# Altium PCB PCB1.pcbdoc
Units mil, origin at the board's own origin, x right, y up, seen from the top; angles counter-clockwise.
Board outline 1654.3 x 1181.16 mil, 2 copper layers (Top Layer, Bottom Layer), stack 1.928 mil thick; 9 components, 8 nets, 31 pads, 1 vias.
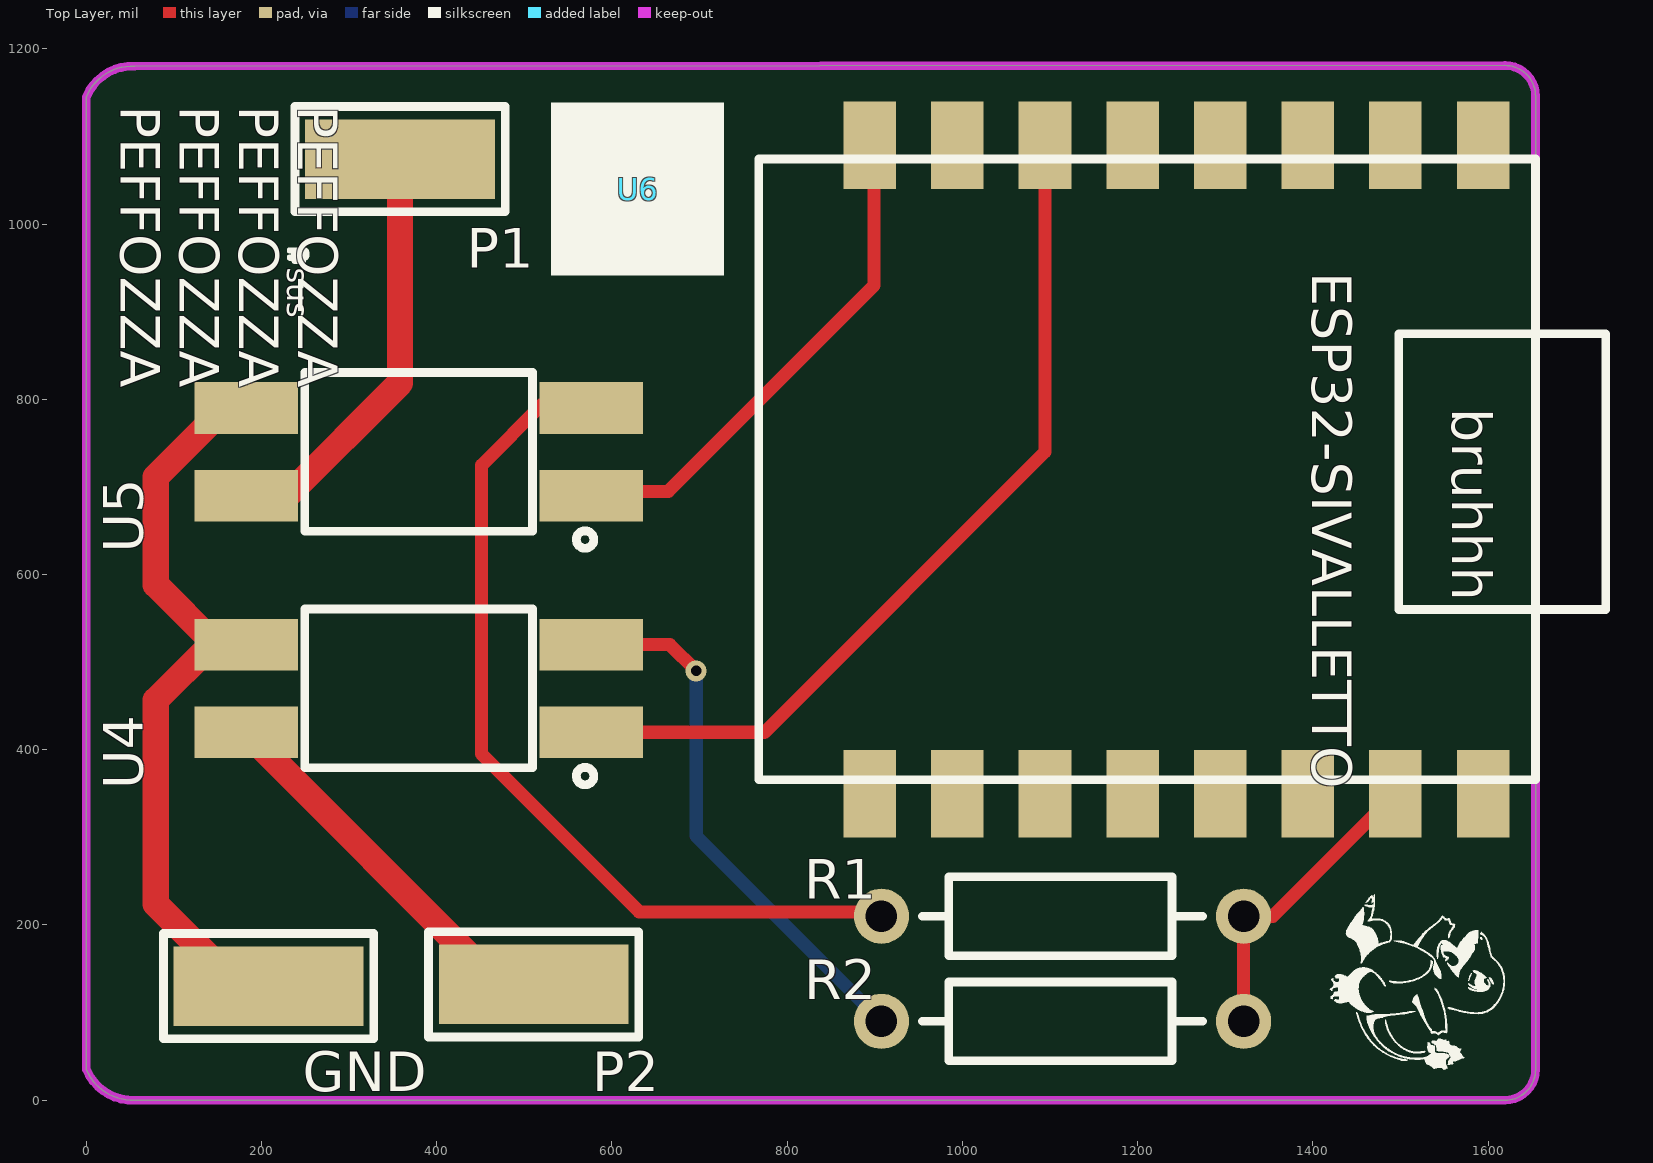
[diagram p0: Top Layer view]
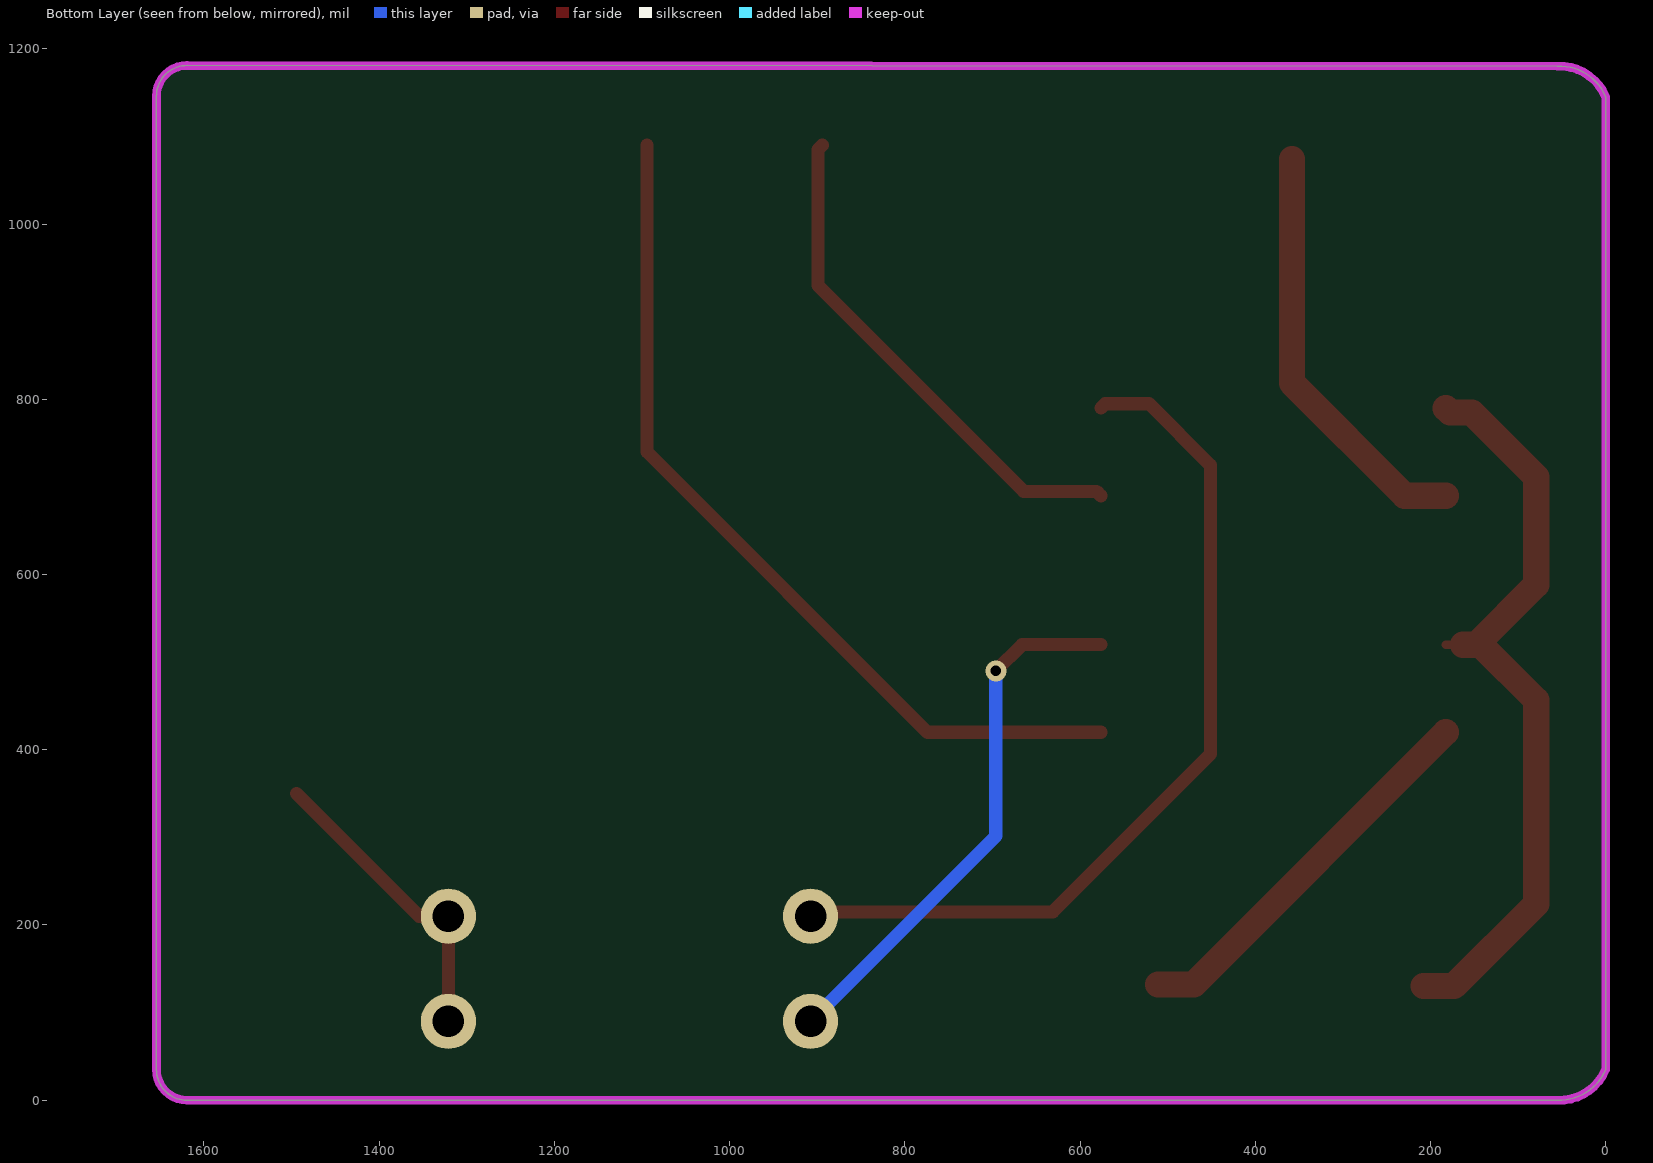
[diagram p1: Bottom Layer view, seen from below]

## Layer stack, top to bottom
Top Solder Mask Layer: solder mask 1.063, Dk 3.3
Top Layer: signal copper 0.472
Dielectric1: surface 0.984, FR4, Dk 4.5
Bottom Layer: signal copper 0.472
Bottom Solder Mask Layer: solder mask 1.063, Dk 3.3

## Board outline
0,35.08 0.06,1145.3 cw(c52.63,1123.39) 55.04,1180.29 1619.27,1181.16 cw(c1619.29,1146.16) 1654.29,1146.16 1654.29,35 cw(c1619.29,35) 1619.29,0 55,0.08 cw(c52.57,56.98) 0,35.08

## Design rules (kind name [scope] priority, off if disabled: settings)
BoardOutlineClearance copperThickness2oz_1 [All] p2 off: genericclearance=7.99 ignorepadtopadclearanceinfootprint=FALSE except(0: Arc-SplitContinuation Track-SplitContinuation SMDPad-SplitContinuation THPad-SplitContinuation Via-SplitContinuation Fill-SplitContinuation Region-SplitContinuation Poly-SplitContinuation Text-SplitContinuation Hole-SplitContinuation; 5.98: Arc-CutoutEdge Track-CutoutEdge SMDPad-CutoutEdge THPad-CutoutEdge Via-CutoutEdge Text-CutoutEdge; 6.9: Hole-OutlineEdge Hole-CutoutEdge; 10: Poly-OutlineEdge Poly-CutoutEdge; 11.81: Arc-OutlineEdge Track-OutlineEdge SMDPad-OutlineEdge THPad-OutlineEdge Via-OutlineEdge Fill-OutlineEdge Region-OutlineEdge Text-OutlineEdge Fill-CutoutEdge Region-CutoutEdge)
BoardOutlineClearance Plane_innerPlane_1 [All] p4 off: genericclearance=4.02 ignorepadtopadclearanceinfootprint=FALSE except(0: Arc-SplitContinuation Track-SplitContinuation SMDPad-SplitContinuation THPad-SplitContinuation Via-SplitContinuation Fill-SplitContinuation Region-SplitContinuation Poly-SplitContinuation Text-SplitContinuation Hole-SplitContinuation; 5.98: Arc-CutoutEdge Track-CutoutEdge SMDPad-CutoutEdge THPad-CutoutEdge Via-CutoutEdge Text-CutoutEdge; 6.9: Hole-OutlineEdge Hole-CutoutEdge; 10: Poly-OutlineEdge Poly-CutoutEdge; 11.81: Arc-OutlineEdge Track-OutlineEdge SMDPad-OutlineEdge THPad-OutlineEdge Via-OutlineEdge Fill-OutlineEdge Region-OutlineEdge Text-OutlineEdge Fill-CutoutEdge Region-CutoutEdge)
BoardOutlineClearance Copper_copperRegion_1 [All] p6 off: genericclearance=4.02 ignorepadtopadclearanceinfootprint=FALSE except(0: Arc-SplitContinuation Track-SplitContinuation SMDPad-SplitContinuation THPad-SplitContinuation Via-SplitContinuation Fill-SplitContinuation Region-SplitContinuation Poly-SplitContinuation Text-SplitContinuation Hole-SplitContinuation; 5.98: Arc-CutoutEdge Track-CutoutEdge SMDPad-CutoutEdge THPad-CutoutEdge Via-CutoutEdge Text-CutoutEdge; 6.9: Hole-OutlineEdge Hole-CutoutEdge; 10: Poly-OutlineEdge Poly-CutoutEdge; 11.81: Arc-OutlineEdge Track-OutlineEdge SMDPad-OutlineEdge THPad-OutlineEdge Via-OutlineEdge Fill-OutlineEdge Region-OutlineEdge Text-OutlineEdge Fill-CutoutEdge Region-CutoutEdge)
BoardOutlineClearance copperThickness1oz_1 [All] p8: genericclearance=4.02 ignorepadtopadclearanceinfootprint=FALSE except(0: Arc-SplitContinuation Track-SplitContinuation SMDPad-SplitContinuation THPad-SplitContinuation Via-SplitContinuation Fill-SplitContinuation Region-SplitContinuation Poly-SplitContinuation Text-SplitContinuation Hole-SplitContinuation; 5.98: Arc-CutoutEdge Track-CutoutEdge SMDPad-CutoutEdge THPad-CutoutEdge Via-CutoutEdge Text-CutoutEdge; 6.9: Hole-OutlineEdge Hole-CutoutEdge; 10: Poly-OutlineEdge Poly-CutoutEdge; 11.81: Arc-OutlineEdge Track-OutlineEdge SMDPad-OutlineEdge THPad-OutlineEdge Via-OutlineEdge Fill-OutlineEdge Region-OutlineEdge Text-OutlineEdge Fill-CutoutEdge Region-CutoutEdge)
Clearance copperThickness2oz [All] p1 off: gap=7.99 ignorepadtopadclearanceinfootprint=FALSE except(5.98: SMDPad-Track SMDPad-SMDPad THPad-Track SMDPad-THPad THPad-THPad Track-Via SMDPad-Via THPad-Via Via-Via Fill-SMDPad Region-SMDPad Fill-THPad Region-THPad Fill-Via Region-Via Fill-Fill Fill-Region Region-Region Arc-Track Arc-SMDPad Arc-THPad Arc-Via Fill-Arc Region-Arc Arc-Arc Text-Track SMDPad-Text Text-THPad Text-Via Fill-Text Region-Text Arc-Text Text-Text; 6.9: Hole-Track Hole-SMDPad Hole-THPad Hole-Via Fill-Hole Region-Hole Hole-Arc Hole-Text; 10: Poly-Track Poly-SMDPad Poly-THPad Poly-Via Poly-Fill Poly-Region Poly-Poly Poly-Arc Poly-Text Poly-Hole; 11.81: Fill-Track Region-Track)
Clearance Plane_innerPlane [All] p3 off: gap=4.02 ignorepadtopadclearanceinfootprint=FALSE except(5.98: SMDPad-Track SMDPad-SMDPad THPad-Track SMDPad-THPad THPad-THPad Track-Via SMDPad-Via THPad-Via Via-Via Fill-SMDPad Region-SMDPad Fill-THPad Region-THPad Fill-Via Region-Via Fill-Fill Fill-Region Region-Region Arc-Track Arc-SMDPad Arc-THPad Arc-Via Fill-Arc Region-Arc Arc-Arc Text-Track SMDPad-Text Text-THPad Text-Via Fill-Text Region-Text Arc-Text Text-Text; 6.9: Hole-Track Hole-SMDPad Hole-THPad Hole-Via Fill-Hole Region-Hole Hole-Arc Hole-Text; 10: Poly-Track Poly-SMDPad Poly-THPad Poly-Via Poly-Fill Poly-Region Poly-Poly Poly-Arc Poly-Text Poly-Hole; 11.81: Fill-Track Region-Track)
Clearance Copper_copperRegion [All] p5 off: gap=4.02 ignorepadtopadclearanceinfootprint=FALSE except(5.98: SMDPad-Track SMDPad-SMDPad THPad-Track SMDPad-THPad THPad-THPad Track-Via SMDPad-Via THPad-Via Via-Via Fill-SMDPad Region-SMDPad Fill-THPad Region-THPad Fill-Via Region-Via Fill-Fill Fill-Region Region-Region Arc-Track Arc-SMDPad Arc-THPad Arc-Via Fill-Arc Region-Arc Arc-Arc Text-Track SMDPad-Text Text-THPad Text-Via Fill-Text Region-Text Arc-Text Text-Text; 6.9: Hole-Track Hole-SMDPad Hole-THPad Hole-Via Fill-Hole Region-Hole Hole-Arc Hole-Text; 10: Poly-Track Poly-SMDPad Poly-THPad Poly-Via Poly-Fill Poly-Region Poly-Poly Poly-Arc Poly-Text Poly-Hole; 11.81: Fill-Track Region-Track)
Clearance copperThickness1oz [All] p7: gap=4.02 ignorepadtopadclearanceinfootprint=FALSE except(5.98: SMDPad-Track SMDPad-SMDPad THPad-Track SMDPad-THPad THPad-THPad Track-Via SMDPad-Via THPad-Via Via-Via Fill-SMDPad Region-SMDPad Fill-THPad Region-THPad Fill-Via Region-Via Fill-Fill Fill-Region Region-Region Arc-Track Arc-SMDPad Arc-THPad Arc-Via Fill-Arc Region-Arc Arc-Arc Text-Track SMDPad-Text Text-THPad Text-Via Fill-Text Region-Text Arc-Text Text-Text; 6.9: Hole-Track Hole-SMDPad Hole-THPad Hole-Via Fill-Hole Region-Hole Hole-Arc Hole-Text; 10: Poly-Track Poly-SMDPad Poly-THPad Poly-Via Poly-Fill Poly-Region Poly-Poly Poly-Arc Poly-Text Poly-Hole; 11.81: Fill-Track Region-Track)
DiffPairsRouting differentialPair [All] p1: maxlimit=6 minlimit=6 mostfreqgap=6 toplayer_minwidth=5 toplayer_prefwidth=10 toplayer_maxwidth=100 toplayer_mingap=6 toplayer_prefgap=6 toplayer_maxgap=6 bottomlayer_minwidth=5 bottomlayer_prefwidth=10 bottomlayer_maxwidth=100 bottomlayer_mingap=6 bottomlayer_prefgap=6 bottomlayer_maxgap=6 maxuncoupledlength=10
HoleToHoleClearance otherClearance [All] p1: gap=11.81 allowstackedmicrovias=TRUE
Length netLength [All] p1: minlimit=0 maxlimit=0
PasteMaskExpansion pasteMaskExpansion [All] p1: expansion=0
PlaneConnect innerPlane [All] p1: planeconnectstyle=Relief reliefexpansion=20 reliefentries=4 reliefconductorwidth=10 reliefairgap=10
PolygonConnect copperRegion [All] p1: connectstyle=Relief reliefconductorwidth=10 reliefentries=4 polygonreliefangle="90 Angle" airgapwidth=10 via.connectstyle=Relief via.reliefconductorwidth=10 via.reliefentries=4 via.polygonreliefangle="90 Angle" via.airgapwidth=10
RoutingVias viaSize [All] p1: holewidth=12.01 width=24.02 viastyle="Through Hole" minholewidth=11.81 minwidth=19.68 maxholewidth=248.03 maxwidth=393.7
SolderMaskExpansion solderMaskExpansion [IsVia] p1: expansion=-1000 istentingtop=TRUE
SolderMaskExpansion solderMaskExpansion [All] p2: expansion=2 istentingtop=FALSE
Width copperThickness2oz_2 [All] p1 off: maxlimit=100 minlimit=8 preferedwidth=10
Width copperThickness1oz_2 [All] p2: maxlimit=100 minlimit=5 preferedwidth=10

## Components (designator, comment, footprint, x,y, rotation, side; value= is the part's Value field where it differs from the comment)
ESP32-SIVALLETTO "ESP32-C3-SUPER-MINI" ESP32-C3-SUPER-MINI 1274.29,720 r270 top
GND "PAD" PAD-SMD_L5.0-W2.0_STHW4-DU-HN050206 208.07,130.24 r180 top
P1 "PAD" PAD-SMD_L5.0-W2.0_STHW4-DU-HN050206 358.07,1074.16 r0 top
P2 "PAD" PAD-SMD_L5.0-W2.0_STHW4-DU-HN050206 510.6,132.19 r180 top
R1 "220Ω" RES-TH_BD2.2-L6.5-P10.50-D0.6 1114.29,210 r180 top
R2 "220Ω" RES-TH_BD2.2-L6.5-P10.50-D0.6 1114.29,90 r180 top
U4 "LTV-817S-TA1" OPTO-SMD-4_L4.6-W6.5-P2.54-LS10.3-BL 379.29,470 r90 top
U5 "LTV-817S-TA1" OPTO-SMD-4_L4.6-W6.5-P2.54-LS10.3-BL 379.29,740 r90 top
U6 "" JLC-QRCODE-5x5 629.29,1040 r0 top

## Footprints (in the part's own frame and the unit in brackets; to place one, negate y for a bottom-side part, rotate by r counter-clockwise, add the part's x,y. Pads: shape width x height; smd on the part's side, far side on the other; paste and mask are expansions set on the pad)
ESP32-C3-SUPER-MINI [mil]
  rect 100x60 smd paste+0 mask+2: 1(-370,320) 2(-370,220) 3(-370,120) 4(-370,20) 5(-370,-80) 6(-370,-180) 7(-370,-280) 8(-370,-380) 9(370,-380) 10(370,-280) 11(370,-180) 12(370,-80) 13(370,20) 14(370,120) 15(370,220) 16(370,320)
  silkscreen extent -354,-507 354,460
JLC-QRCODE-5x5 [mil]
  silkscreen extent -98,-98 98,98
OPTO-SMD-4_L4.6-W6.5-P2.54-LS10.3-BL [mm]
  rect 1.5x3 smd: 1(-1.27,-5) 2(1.27,-5) 3(1.27,5) 4(-1.27,5)
  silkscreen extent -2.79,-5.08 2.3,3.3
PAD-SMD_L5.0-W2.0_STHW4-DU-HN050206 [mm]
  rect 5.5x2.3 smd: 1(0,0)
  silkscreen extent -3.05,-1.52 3.05,1.52
RES-TH_BD2.2-L6.5-P10.50-D0.6 [mm]
  round 1.6 hole 0.914: 1(-5.25,0) 2(5.25,0)
  silkscreen extent -4.06,-1.14 4.06,1.14

## Via types
v1: diameter 24.02, hole 12, Top Layer to Bottom Layer, 1 vias

## Nets (pads, with @x,y where several pads share a name; then routed paths per layer and width w, separated by ;. In a path a pad name is that pad's centre, name@x,y a point inside that pad or via, vN(x,y) a via of type N, cw(c..) or ccw(c..) an arc to the next point about the centre after c; other vN are vias at no path point)
$1N660: P1.1 U5.4 | length 484.4
  Top Layer w30: U5.4 229.29,690 358.07,818.77 P1.1
$1N788: ESP32-SIVALLETTO.15 R1.1 R2.1 | length 351.3
  Top Layer w15: R2.1 R1.1 1354.29,210 ESP32-SIVALLETTO.15
$1N828: ESP32-SIVALLETTO.8 U5.1 | length 584.6
  Top Layer w15: U5.1 581.14,695 664.29,695 899.29,930 899.29,1085 ESP32-SIVALLETTO.8
$1N985: P2.1 U4.4 | length 447.4
  Top Layer w30: U4.4 470.25,132.19 P2.1
$1N3932: R1.2 U5.2 | length 1019.2
  Top Layer w15: U5.2 571.14,795 521.14,795 451.14,725 451.14,395 631.14,215 902.6,215 R1.2
$1N3971: R2.2 U4.2 | length 620
  Top Layer w15: U4.2 666.14,520 v1(696.14,490)
  Bottom Layer w15: v1(696.14,490) 696.14,301.45 R2.2
$1N4239: ESP32-SIVALLETTO.6 U4.1 | length 1000.7
  Top Layer w15: U4.1 774.29,420 1094.29,740 ESP32-SIVALLETTO.6
GND: GND.1 U4.3 U5.3 | length 885.1
  Top Layer w10: U4.3@162.82,520 U4.3
  Top Layer w30: U4.3@162.82,520 U4.3@147.82,520 ; U5.3 177.44,785 152.82,785 79.29,711.47 79.29,588.53 U4.3@147.82,520 ; GND.1 173.07,130.24 79.29,224.02 79.29,456.47 142.82,520 U4.3@147.82,520
pads on no net: ESP32-SIVALLETTO.1 ESP32-SIVALLETTO.2 ESP32-SIVALLETTO.3 ESP32-SIVALLETTO.4 ESP32-SIVALLETTO.5 ESP32-SIVALLETTO.7 ESP32-SIVALLETTO.9 ESP32-SIVALLETTO.10 ESP32-SIVALLETTO.11 ESP32-SIVALLETTO.12 ESP32-SIVALLETTO.13 ESP32-SIVALLETTO.14 ESP32-SIVALLETTO.16

## Keep-outs
Board Outline Layer:
  the board outline again, w10

## Silkscreen, mask and mechanical layers (free items; w line width, h text height)
Top Silkscreen Layer:
  drawing of 17 lines, arcs and shapes, not listed
  text "PEFFOZZA / PEFFOZZA / PEFFOZZA / PEFFOZZA" at 39.29,1135 h45 r270
  text "sus" at 229.29,950 h25 r270
  text "bruhhh" at 1559.29,790 h45 r270